# Altium PCB altium-comments.PcbDoc
Units mm, origin at the board's own origin, x right, y up, seen from the top; angles counter-clockwise.
Board outline not stored, 1 copper layers (Top Layer); 22 components, 20 nets, 99 pads, 36 vias.
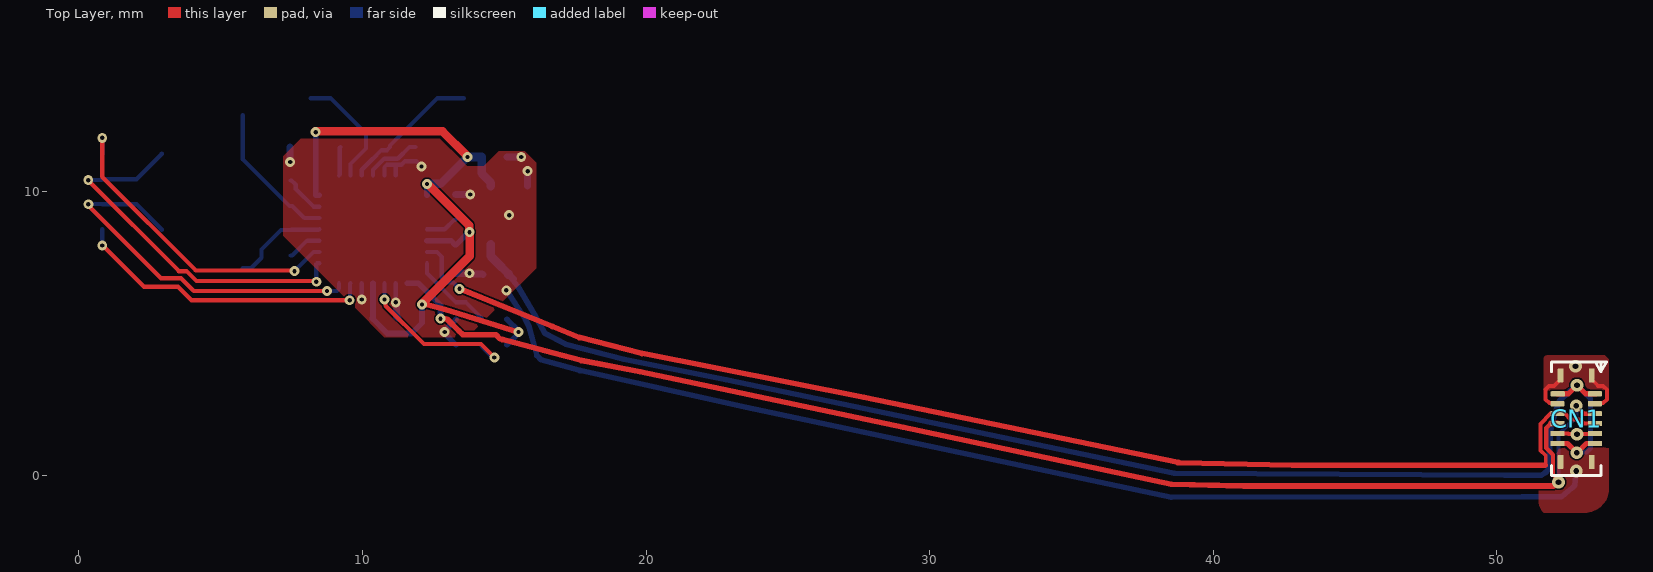
[diagram p0: Top Layer view]
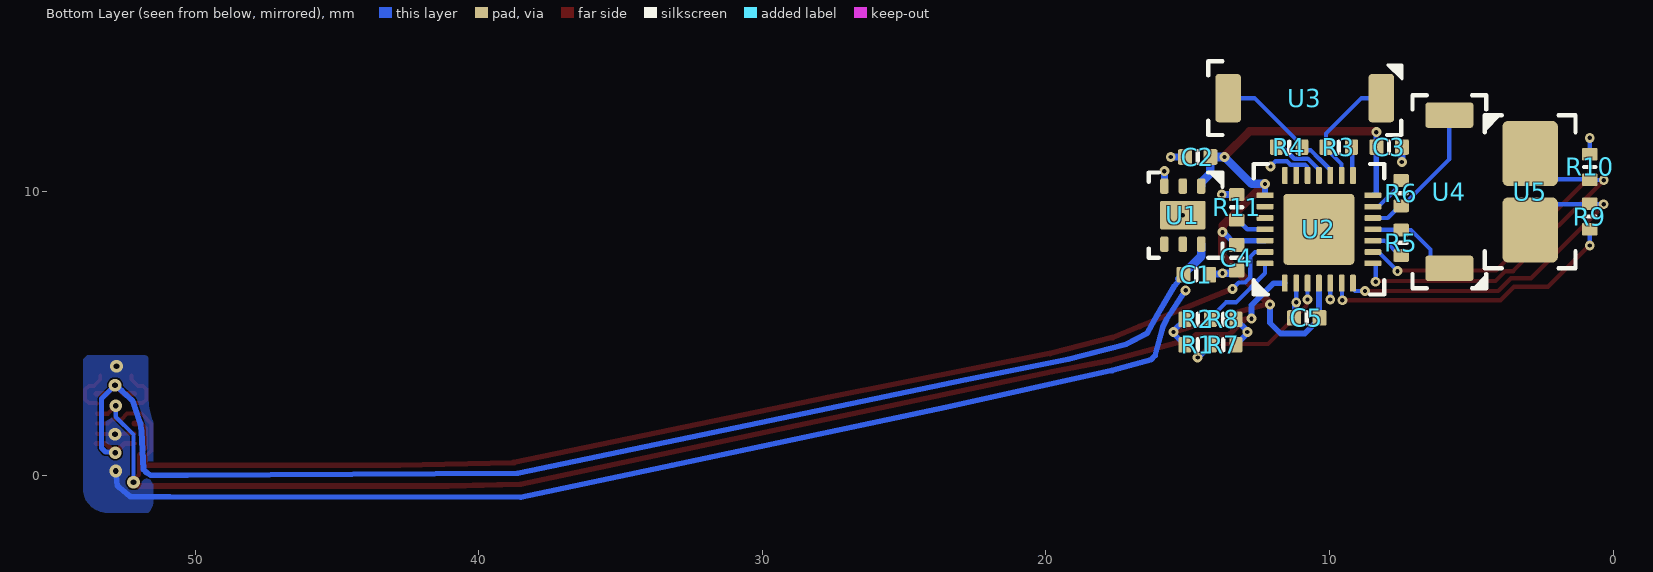
[diagram p1: Bottom Layer view, seen from below]

## Layer stack, top to bottom
Top Layer: signal copper (thickness not stored)

## Classes and differential pairs
component class 4_rm3100: C3 C4 C5 R1 R2 R3 R4 R5 R6 R7 R8 R9 R10 R11 U2 U3 U4 U5
component class 3_ldo: C1 C2 U1
component class 2_conn: CN1

## Components (designator, comment, footprint, x,y, rotation, side; value= is the part's Value field where it differs from the comment)
C1 "SC1U25V2KX" CAPC0402(1005)60_L 14.7,7.075 r0 bottom value=1µF
C2 "SC1U25V2KX" CAPC0402(1005)60_L 14.65,11.225 r180 bottom value=1µF
C3 "SC1U25V2KX" CAPC0402(1005)60_L 7.9,11.575 r0 bottom value=1µF
C4 "SC1U25V2KX" CAPC0402(1005)60_L 13.275,7.675 r90 bottom value=1µF
C5 "SC1U25V2KX" CAPC0402(1005)60_L 10.8,5.55 r180 bottom value=1µF
CN1 "BM23FR0.6-12DP-0.35V" BM23FR0.6-12DP-0.35V 52.798,2 r270 top
R1 "0R2J" RESC0402(1005)_L 14.65,4.6 r0 bottom value="0.00 Ohm"
R2 "0R2J" RESC0402(1005)_L 14.65,5.5 r0 bottom value="0.00 Ohm"
R3 "121R2F" RESC0402(1005)_L 9.675,11.575 r0 bottom value="121.00 Ohm"
R4 "121R2F" RESC0402(1005)_L 11.425,11.575 r180 bottom value="121.00 Ohm"
R5 "121R2F" RESC0402(1005)_L 7.475,8.2 r90 bottom value="121.00 Ohm"
R6 "121R2F" RESC0402(1005)_L 7.475,9.95 r270 bottom value="121.00 Ohm"
R7 "0R2J" RESC0402(1005)_L 13.75,4.6 r0 bottom value="0.00 Ohm"
R8 "0R2J" RESC0402(1005)_L 13.75,5.5 r0 bottom value="0.00 Ohm"
R9 "121R2F" RESC0402(1005)_L 0.825,9.125 r90 bottom value="121.00 Ohm"
R10 "121R2F" RESC0402(1005)_L 0.825,10.875 r270 bottom value="121.00 Ohm"
R11 "33KR2F" RESC0402(1005)_L 13.275,9.45 r270 bottom value="33000.00 Ohm"
U1 "TPS70933DRV" DRV0006A 15.175,9.175 r270 bottom
U2 "13156" PNI_13156_V 10.375,8.675 r90 bottom
U3 "13104" PNI_13104_V 10.875,13.3 r0 bottom
U4 "13104" PNI_13104_V 5.775,10 r90 bottom
U5 "13101" PNI_13101_V 2.925,10 r270 bottom

## Footprints (in the part's own frame and the unit in brackets; to place one, negate y for a bottom-side part, rotate by r counter-clockwise, add the part's x,y. Pads: shape width x height; smd on the part's side, far side on the other; paste and mask are expansions set on the pad)
BM23FR0.6-12DP-0.35V [mm] "SMD, 12-Leads, Body 4.6x1.98mm, Pitch 0.35mm"
  rrect30% 0.18x0.5 smd: 1(-0.875,0.66) 2(-0.875,-0.65) 3(-0.525,0.66) 4(-0.525,-0.66) 5(-0.175,0.66) 6(-0.175,-0.66) 7(0.175,0.66) 8(0.175,-0.66) 9(0.525,0.66) 10(0.525,-0.66) 11(0.875,0.66) 12(0.875,-0.66)
  rrect30% 0.5x0.2 smd: MP1(-1.525,0.55) MP2(-1.525,-0.55) MP3(1.525,0.55) MP4(1.525,-0.55)
  silkscreen extent -2,-0.87 2,0.87
CAPC0402(1005)60_L [mm] "Chip Capacitor, Body 1.0x0.5mm, Height 0.6mm, IPC High Density"
  rrect25% 0.5x0.55 smd: 1(-0.45,0) 2(0.45,0)
  silkscreen extent 0,-0.2 0,0.2
DRV0006A [mm] "WSON, 6-Leads, Body 2x2mm, Pitch 0.65mm, Thermal Pad 1.6x1mm"
  rrect50% 0.55x0.3 smd: 1(-1.025,0.65) 2(-1.025,0) 3(-1.025,-0.65) 4(1.025,-0.65) 5(1.025,0) 6(1.025,0.65)
  rrect10% 1x1.6 smd paste-1: 7(0,0)
  rrect10% 0.85x0.4 on Bottom Paste: SOLDERPASTE(0,-0.5) SOLDERPASTE(0,0) SOLDERPASTE(0,0.5)
  silkscreen extent -1.5,0.9 1.5,1.4
PNI_13101_V [mm]
  rrect20% 2.3x1.95 smd paste-2539.97: 1(-1.35,0) 2(1.35,0)
  rrect25% 1.7x1.35 on Top Paste: 1(-1.05,0) 2(1.05,0)
  silkscreen extent -2.7,-1.6 2.7,1.6
PNI_13104_V [mm]
  rrect25% 0.9x1.7 smd paste-2539.97: 1(-2.7,0) 2(2.7,0)
  rrect25% 0.6x1.2 on Bottom Paste: 1(-2.65,0) 2(2.65,0)
  silkscreen extent -3.4,-1.3 3.4,1.3
PNI_13156_V [mm]
  rrect35% 0.6x0.2 smd: 1(-1.9,1.2) 2(-1.9,0.8) 3(-1.9,0.4) 4(-1.9,0) 5(-1.9,-0.4) 6(-1.9,-0.8) 7(-1.9,-1.2) 15(1.9,-1.2) 16(1.9,-0.8) 17(1.9,-0.4) 18(1.9,0) 19(1.9,0.4) 20(1.9,0.8) 21(1.9,1.2)
  rrect35% 0.2x0.6 smd: 8(-1.2,-1.9) 9(-0.8,-1.9) 10(-0.4,-1.9) 11(0,-1.9) 12(0.4,-1.9) 13(0.8,-1.9) 14(1.2,-1.9) 22(1.2,1.9) 23(0.8,1.9) 24(0.4,1.9) 25(0,1.9) 26(-0.4,1.9) 27(-0.8,1.9) 28(-1.2,1.9)
  rrect10% 2.5x2.5 smd paste-2539.97 mask+0.102: 29(0,0)
  silkscreen extent -2.3,-2.3 2.3,2.3
RESC0402(1005)_L [mm] "Chip Resistor, Body 1.0x0.5mm, IPC High Density"
  rrect25% 0.45x0.55 smd: 1(-0.45,0) 2(0.45,0)
  silkscreen extent 0,-0.2 0,0.2

## Part data
C1 C2 C3 C4 C5: library part CMP-00452.1, "CAP 1uF 25V ±10% 0402 (1005 Metric) Thickness 0.6mm SMD", Case-EIA=0402, Case-Metric=1005, Dielectric=X5R, Rated Voltage="25 V", Tolerance=±10%, Voltage Rating=25V, Case/Package=0402, Max Thickness="0.6 mm", Mounting Technology=SMT, Pins=2, Technology=SMT
CN1: "Plug Connector, 30 V, 0.3 A, -55 to 85 degC, RoHS, Tape and Reel", Contact Resistance=90mR, Current Rating=300mA, Housing Color=Black, Manufacturer=Hirose, Max Operating Temperature=85°C, Max Voltage Rating (AC)=30V, Min Operating Temperature=-35°C, Package Quantity=1, Connector Type=Plug, Contact Material=Bronze, Contact Plating=Gold, Depth=1.85mm, Gender=Male, Housing Material=Polymer, Lead Free="Lead Free", Length=3.52mm, Mated Stacking Heights=4mm, Max Current Rating=300mA, Mount="Surface Mount", Number of Contacts=10, Number of Positions=10, Number of Rows=2, Orientation=Straight, Packaging="Tape and Reel", Part number=BM23FR0.6-12DP-0.35V, Pitch=0.4mm, REACH SVHC="No SVHC", Termination=SMD/SMT, Voltage Rating=30V
R1 R2 R7 R8: library part CMP-07812-11, "Jumper 0402 (1005 Metric)", Case-EIA=0402, Case-Metric=1005, Power=None, Technology=SMT, Tolerance=None
R3 R4 R5 R6 R9 R10: library part CMP-07879-11, "121R 0.063W 1% 0402 (1005 Metric)  SMD", Case-EIA=0402, Case-Metric=1005, Power="0.063 W", Tolerance="1 %", Technology=SMT
R11: library part CMP-08266-11, "33K 0.063W 1% 0402 (1005 Metric)  SMD", Case-EIA=0402, Case-Metric=1005, Power="0.063 W", Tolerance="1 %", Technology=SMT
U1: library part CMP-00199.1, "150-mA, 30-V, 1-µA IQ Voltage Regulators with Enable", Dropout Voltage=960mV, Max Input Voltage=30V, Max Operating Temperature=125°C, Max Output Current=150mA, Min Current Limit=200mA, Min Input Voltage=2.7V, Min Operating Temperature=-40°C, Nominal Output Voltage=3.3V, Package Quantity=250, Power Supply Rejection Ratio (PSRR)=150dB, Quiescent Current=1uA, Accuracy=2%, Contact Plating=Gold, Lead Free="Lead Free", Mount="Surface Mount", Number of Outputs=1, Number of Pins=6, Number of Regulators=1, Output Current=150mA, Output Type=Fixed, Output Voltage=3.3V, Packaging="Tape and Reel", Polarity=Positive, Radiation Hardening=No, REACH SVHC="No SVHC", Weight=0.000342oz
U2: "MagI2C 3-channel sensor interface 2V to 3.6V 28-Pin QFN", Component package=QFN-28, Manufacturer=PNI, Category=Uncategorized, Manufacturer Part Number=13156
U3 U4: "Sen-XY-f sensor coil for RM2100/RM3100", Manufacturer=PNI, Category=Uncategorized, Manufacturer Part Number=13104
U5: "Sen-Z-f sensor coil for RM2100/RM3100", Manufacturer=PNI, Category=Uncategorized, Manufacturer Part Number=13101

## Via types
v1: diameter 0.35, hole 0.15, Top Layer to Bottom Layer, tented both sides, 29 vias
v2: diameter 0.45, hole 0.2, Top Layer to Bottom Layer, tented both sides, 7 vias

## Nets (pads, with @x,y where several pads share a name; then routed paths per layer and width w, separated by ;. In a path a pad name is that pad's centre, name@x,y a point inside that pad or via, vN(x,y) a via of type N, cw(c..) or ccw(c..) an arc to the next point about the centre after c; other vN are vias at no path point)
GND: C1.1 C2.1 C3.1 C4.1 C5.1 CN1.3 CN1.4 CN1.9 CN1.10 CN1.MP1 CN1.MP2 CN1.MP3 CN1.MP4 R7.1 R8.1 R11.1 U1.3 U1.7 U2.2 U2.5 U2.19 U2.20 | length 53.3
  Top Layer w0.14: CN1.10 52.505,1.475 52.53,1.45 v2(52.825,1.45) 52.837,1.462 53.446,1.462 CN1.9 ; CN1.4 52.118,2.545 51.851,2.545 51.718,2.678 51.718,3.02 51.845,3.147 52.02,3.147 52.248,3.375 CN1.MP2 ; CN1.MP1 53.348,3.375 53.576,3.147 53.751,3.147 53.878,3.02 53.878,2.678 53.745,2.545 53.478,2.545 CN1.3
  Bottom Layer w0.15: v1(9.975,6.2) U2.5 ; U2.19 10.775,10.867 10.863,10.955 11.124,10.955 ; v1(11.175,6.1) U2.2 ; U2.20 11.175,10.904 11.124,10.955 ; v1(12.087,10.892) 11.903,11.075 11.505,11.075 11.385,10.955 11.124,10.955
  Bottom Layer w0.2: R7.1 12.9,5 v1(12.9,5.05) 12.9,5.1 R8.1 ; v1(15.075,6.525) 15.738,5.511 15.885,5.209 16.155,4.22 16.299,4.077 17.658,3.698 23.525,2.4 33.174,0.35 38.521,-0.769 50.896,-0.75 52.171,-0.75 52.277,-0.75 52.66,-0.441 52.746,-0.355 v2(52.8,0.15)
  Bottom Layer w0.25: v1(7.45,11.05) 7.45,11.425 C3.1 ; v1(11.175,6.1) 11.194,6.081 11.194,5.606 C5.1 ; C4.1@13.275,7.125 v1(13.775,7.125) 13.794,7.106 14.219,7.106 C1.1 ; R11.1 v1(13.8,9.9) ; C2.1 v1(15.6,11.225) ; U1.3 v1(15.825,10.725)
  other v1: 15.175,9.175
  other v2: 52.775,3.85
MAG_SCL: CN1.6 CN1.7 U2.27 | length 44.9
  Top Layer w0.14: 51.7,0.356 51.726,0.382 51.726,0.693 51.538,0.88 51.538,1.813 51.9,2.175 52.4,2.175 52.601,1.974 52.93,1.974 53.079,1.825 CN1.7
  Top Layer w0.2: v1(13.425,6.575) 16.704,5.246 17.65,4.862 19.842,4.302 19.86,4.298 27.672,2.751 27.676,2.75 38.748,0.456 ; 38.749,0.455 ccw(c38.809,0.749) 38.803,0.449 42.783,0.356 51.7,0.356
  Bottom Layer w0.15: U2.27 12.625,7.875 12.8,7.7 12.8,6.975 12.977,6.798 13.202,6.798 v1(13.425,6.575)
MAG_SDA: CN1.5 CN1.8 U2.1 | length 48.5
  Top Layer w0.15: CN1.8@51.904,1.825 51.743,1.665 51.743,0.965 51.985,0.724 51.985,0.025 v2@52.128,-0.119 ; v2(52.8,2.45) 53.075,2.175 CN1.5
  Top Layer w0.2: v1@12.764,5.525 12.922,5.525 12.991,5.504 13.404,5.091 13.534,4.96 14.7,4.96 14.848,4.812 14.926,4.792 16.704,4.32 17.716,4.051 17.727,4.049 19.797,3.65 29.075,1.7 38.522,-0.319 41.072,-0.375 48.55,-0.375 52.001,-0.375 52.064,-0.312 v2@52.136,-0.24 ; CN1.8@51.904,1.825 CN1.8 ; v2@52.128,-0.119 52.128,-0.193 v2(52.176,-0.24)
  Top Layer w0.3: v2@52.136,-0.24 v2(52.176,-0.24)
  Bottom Layer w0.15: v2(52.176,-0.24) 52.176,1.438 52.8,2.061 v2(52.8,2.45)
  Bottom Layer w0.2: U2.1 11.975,6.775 12.75,6 v1(12.75,5.525)
RM3100_AD0: R1.1 R7.2 U2.3 | length 6.1
  Top Layer w0.15: v1(10.775,6.2) 10.813,6.162 10.813,5.98 12.166,4.627 14.178,4.627 v1(14.651,4.154)
  Bottom Layer w0.15: v1(10.775,6.2) U2.3 ; R7.2 14.2,4.55 14.558,4.192 14.613,4.192 v1(14.651,4.154)
RM3100_AD1: R2.1 R8.2 U2.28 | length 3
  Bottom Layer w0.15: U2.28 12.275,7.125 13.3,6.1 13.65,6.1 14.2,5.55 R8.2
RM3100_REXT: R11.2 U2.25 | length 1.1
  Bottom Layer w0.15: U2.25 12.9,8.675 13.225,9 R11.2
VCC3: C2.2 C3.2 C4.2 C5.2 R1.2 R2.2 U1.1 U2.4 U2.14 U2.22 U2.26 | length 27.9
  Top Layer w0.2: v1@12.225,6.025 12.889,5.86 v1(15.5,5.05)
  Top Layer w0.3: v1@8.35,12.125 12.825,12.125 v1@13.7,11.25 ; v1@12.1,6.05 13.775,7.725 13.775,8.6 13.765,8.61 13.765,8.81 v1@12.285,10.29
  Bottom Layer w0.2: v1(8.35,12.1) C3.2 8.35,9.875 U2.14 ; U2.4 10.375,5.575 C5.2 10.35,5.525 10.875,5 11.725,5 12.1,5.375 v1(12.1,6.025) ; U2.26 13.125,8.275 C4.2 13.3,8.125 13.75,8.575 v1(13.775,8.575) ; U2.22 v1(12.275,10.275) ; R1.2 15.5,5 v1(15.5,5.05) 15.5,5.1 R2.2
  Bottom Layer w0.3: v1(12.275,10.275) 12.75,10.275 v1(13.7,11.225) C2.2 14.2,10.65 14.525,10.325 U1.1
VCC18: C1.2 CN1.1 CN1.2 CN1.11 CN1.12 U1.6 | length 49.5
  Top Layer w0.18: CN1.12 52.492,1.125 52.815,0.802 v2(52.815,0.8) ; CN1.2 52.525,2.875 v2(52.825,3.175) 53.125,2.875 CN1.1@53.502,2.875 ; v2@52.833,0.8 53.158,1.125 CN1.11@53.492,1.125
  Bottom Layer w0.18: v2@52.815,0.825 53.16,0.825 53.3,0.965 53.3,2.7 v2(52.825,3.175)
  Bottom Layer w0.2: C1.2@15.344,6.935 15.325,6.954 15.25,7.029 C1.2 15.25,6.95 15.46,6.684 16.065,5.668 16.429,5.009 17.165,4.627 19.215,4.097 22.826,3.375 38.63,0.075 50.269,0 51.556,0 ; 51.557,0.001 51.556,0 ; v2(52.825,3.175) 52.583,2.975 52.197,2.616 51.93,1.825 51.891,1.556 51.825,0.206 51.71,0.092 51.556,0
  Bottom Layer w0.3: U1.6 14.525,7.725 14.737,7.513 15.15,7.1 C1.2
X_DRV_N: R4.1 U2.18 | length 2
  Bottom Layer w0.15: U2.18 10.375,10.775 10.765,11.165 11.246,11.165 11.656,11.575 R4.1
X_DRV_P: R3.1 U2.15 | length 1
  Bottom Layer w0.15: U2.15 9.2,10.6 9.2,11.55 R3.1
X_IN_N: R4.2 U2.17 U3.2@13.575,13.3 | length 4.9
  Bottom Layer w0.15: U2.17 9.975,10.775 10.365,11.165 10.373,11.165 10.675,11.467 10.867,11.467 R4.2 10.975,11.625 12.65,13.3 U3.2@13.575,13.3
X_IN_P: R3.2 U2.16 U3.1@8.175,13.3 | length 4.2
  Bottom Layer w0.15: U3.1@8.175,13.3 8.875,13.3 10.125,12.05 R3.2 10.125,11.525 9.575,10.975 U2.16
Y_DRV_N: R6.1 U2.13 | length 1.5
  Bottom Layer w0.15: R6.1 7.5,10.4 7.65,10.25 7.65,10.1 8.275,9.475 U2.13
Y_DRV_P: R5.1 U2.10 | length 1.2
  Bottom Layer w0.15: R5.1 7.525,7.75 8.05,8.275 U2.10
Y_IN_N: R6.2 U2.12 U4.2@5.775,12.7 | length 5.1
  Bottom Layer w0.15: U4.2@5.775,12.7 5.775,11.15 7.425,9.5 R6.2 7.525,9.5 7.95,9.075 U2.12
Y_IN_P: R5.2 U2.11 U4.1@5.775,7.3 | length 3.4
  Bottom Layer w0.15: U4.1@5.775,7.3 6.065,7.3 6.438,7.672 6.438,7.963 7.125,8.65 R5.2 7.488,8.663 8.463,8.663 U2.11
Z_DRV_N: R10.1 U2.9 | length 11.3
  Top Layer w0.15: v1@0.825,11.925 0.825,10.525 4.125,7.225 v1@7.6,7.225
  Bottom Layer w0.15: R10.1 v1(0.825,11.9) ; v1(7.6,7.2) 8.275,7.875 U2.9
Z_DRV_P: R9.1 U2.6 | length 10.7
  Top Layer w0.15: v1@0.825,8.125 2.3,6.65 3.5,6.65 3.975,6.175 v1(9.55,6.175)
  Bottom Layer w0.15: v1(0.825,8.1) R9.1 ; v1(9.55,6.175) 9.563,6.188 9.563,6.763 U2.6
Z_IN_N: R10.2 U2.8 U5.1@2.925,11.35 | length 13.3
  Top Layer w0.15: v1(0.331,10.409) 0.331,10.394 3.525,7.2 3.8,7.2 4.15,6.85 v1@8.375,6.85
  Bottom Layer w0.15: v1(0.331,10.409) 0.339,10.417 0.804,10.417 0.825,10.438 2.034,10.438 2.925,11.329 U5.1@2.925,11.35 ; v1(8.375,6.825) 8.375,7.45 8.4,7.475 U2.8
Z_IN_P: R9.2 U2.7 U5.2@2.925,8.65 | length 13.4
  Top Layer w0.15: v1(0.333,9.558) 0.333,9.517 2.9,6.95 3.6,6.95 4.05,6.5 v1(8.75,6.5)
  Bottom Layer w0.15: v1(0.333,9.558) 0.342,9.566 0.821,9.566 0.825,9.562 2.034,9.562 2.925,8.671 U5.2@2.925,8.65 ; v1(8.75,6.5) 9.1,6.5 9.175,6.575 U2.7
pads on no net: U1.2 U1.4 U1.5 U1.SOLDERPASTE U2.21 U2.23 U2.24 U2.29 U3.1@8.225,13.3 U3.2@13.525,13.3 U4.1@5.775,7.35 U4.2@5.775,12.65 U5.1@2.925,11.05 U5.2@2.925,8.95

## Silkscreen, mask and mechanical layers (free items; w line width, h text height)
Top Overlay:
  lines w0.1: 53.471,4 53.875,4 53.673,3.65 53.471,4
Bottom Overlay:
  region: 7.45,13.975 7.45,14.475 7.95,14.475
  lines w0.1: 7.45,13.975 7.95,14.475 7.45,14.475 7.45,13.975
  lines w0.15: 16.025,7.675 16.375,7.675 16.375,8 ; 16.025,10.675 16.375,10.675 16.375,10.35
Board:
  lines w0.1: 0,7.5 ccw(c1.303,7.803) 1,6.5 14,4 18.193,2.818 38.084,-1.228 ccw(c40.508,10.644) 40.516,-1.473 53.108,-1.473 ccw(c53.109,-0.474) 54.108,-0.473 54.108,4.096 ccw(c53.808,4.096) 53.808,4.396 51.788,4.396 ccw(c51.788,4.096) 51.488,4.096 51.488,2.727 cw(c49.88,2.711) 51.478,2.531 cw(c49.488,2.726) 49.488,0.727 40.516,0.727 cw(c40.514,10.742) 38.522,0.927 19.218,4.855 cw(c19.87,8.059) 16.6,8.059 16.6,15 ccw(c15.6,15) 15.6,16 14.095,16 ccw(c14.095,15) 13.906,15.982 1,13.5 ccw(c1.303,12.197) 0,12.5 0,7.5
Top stiffener:
  lines w0.1: 0,7.5 ccw(c1.303,7.803) 1,6.5 13.906,4.018 ccw(c14.095,5) 14.095,4 15.6,4 ccw(c15.6,5) 16.6,5 16.6,15 ccw(c15.6,15) 15.6,16 14.095,16 ccw(c14.095,15) 13.906,15.982 1,13.5 ccw(c1.303,12.197) 0,12.5 0,7.5
  lines w0.15: 13.9,2.75 14.225,3.075 ; 14.225,0.8 14.225,3.075 ; 14.55,2.75 14.225,3.075
  text "Top stiff PI 0.2mm" at 6.225,-0.773 h2
Bottom stiffener:
  lines w0.1: 51.488,-0.473 ccw(c52.487,-0.474) 52.488,-1.473 53.108,-1.473 ccw(c53.109,-0.474) 54.108,-0.473 54.108,4.096 ccw(c53.808,4.096) 53.808,4.396 51.788,4.396 ccw(c51.788,4.096) 51.488,4.096 51.488,-0.473
  lines w0.15: 52.6,-2.375 52.925,-2.05 ; 52.925,-4.325 52.925,-2.05 ; 53.25,-2.375 52.925,-2.05
  text "Bottom stiff AL 0.2mm" at 44.925,-6.065 h2
Top adhesive:
  lines w0.15: 17.25,9.5 16.75,10 ; 17.25,10.5 16.75,10 ; 20,10 16.75,10
  text "Top Adhesive" at 20,9.537 h2